# Altium PCB ePBR25_ACU_Power_rev0.PcbDoc (part 4 of 5)
Units mil, origin at the board's own origin, x right, y up, seen from the top; angles counter-clockwise.
Board outline 8211 x 3959 mil, 2 copper layers (Top Layer, Bottom Layer); 145 components, 129 nets, 544 pads, 1610 vias.
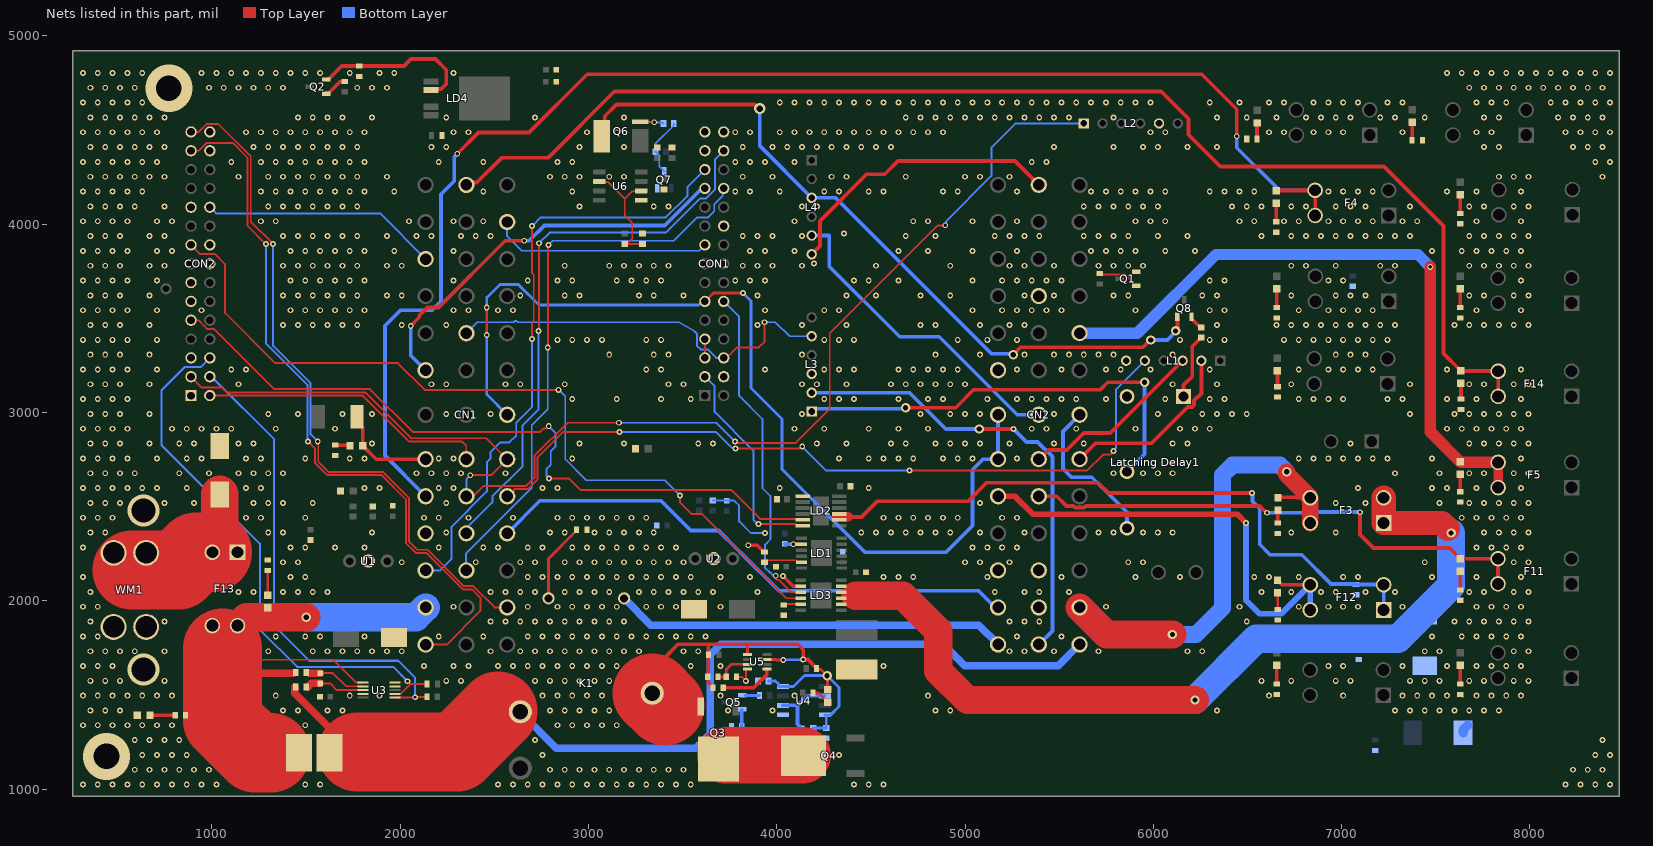
[diagram p3: the nets of this part, all layers, seen from the top]

## Via types
v1: diameter 31, hole 17, Top Layer to Bottom Layer, 1578 vias
v2: diameter 50, hole 28, Top Layer to Bottom Layer, 24 vias
v3: diameter 30, hole 15, Top Layer to Bottom Layer, 3 vias
v4: diameter 170, hole 128, Top Layer to Bottom Layer, 2 vias
v5: diameter 250, hole 137, Top Layer to Bottom Layer, 2 vias
v6: diameter 60, hole 34, Top Layer to Bottom Layer, 1 vias

## Nets (pads, with @x,y where several pads share a name; then routed paths per layer and width w, separated by ;. In a path a pad name is that pad's centre, name@x,y a point inside that pad or via, vN(x,y) a via of type N, cw(c..) or ccw(c..) an arc to the next point about the centre after c; other vN are vias at no path point) (continued)
GND: "Latching Delay1.2" C1.2 C2.1 C3.1 C4.1 C5.1 C6.1 C7.1 C8.1 C9.1 C10.2 C11.1 C12.1 C13.2 C14.1 C15.1 C16.2 C18.1 C20.2 C21.1 CN1.30 CN2.11 CN2.18 CN2.32 CN2.33 CN2.35 CON1.A3 CON1.A4 CON1.A14 CON1.A15 CON1.B2 CON1.B10 CON1.B15 CON2.A1 CON2.A3 CON2.A6 CON2.A7 CON2.A11 CON2.B8 CON2.B9 CON2.B14 CON2.B15 D17.1 D18.1 D19.2 D20.2 D22.1 L1.6 L2.5 L3.3 LD1.2 LD2.1 LD3.2 Q1.2 Q7.2 R2.2 R3.2 R4.2 R5.2 R6.2 R7.2 R8.2 R9.2 R10.2 R11.2 R12.2 R13.2 R14.2 R15.2 R16.2 R18.2 R19.2 R20.2 R21.1 R22.1 R24.2 R25.2 R26.1 R27.1 R29.1 R31.1 R37.2 R39.1 R40.1 R45.1 R46.2 R51.1 R52.1 R53.1 U1.2 U2.2 U3.4 U3.9 U3.10 U4.1 U5.4 U6.1 WM1.2 | length 1125.5
  Top Layer w10: CON1.A3@3618.02,3290 CON1.A4@3618.02,3390 ; R45.1@3786.56,1596 3813.7,1596 v1(3835.54,1574.15) 3835.54,1634.3 3838.42,1637.18 U5.4@3844.03,1637.18 ; R13.2@6652.22,1907.22 R13.2@6661,1898.44 ; R5.2@6656.06,2357.44 R5.2@6660,2357.44 ; R10.2@7630,1502.44 7633.94,1502.44 7642.72,1493.66 7642.72,1488.43 7643.34,1487.8 7643.34,1487.66
  Top Layer w18: v1(3848.7,2295.02) 3895.6,2295.02 3931.62,2259 R21.1@3932,2259 ; v1(4032.5,2132.36) 4088.38,2076.49 LD3.2@4127.5,2076.49 ; v1(4087,2299.99) LD1.2@4130.5,2299.98
  Top Layer w20: CON2.B14@989,4390 CON2.B14@1007.49,4390
  Top Layer w40: v5(440,1174) v5@458,1156
  Bottom Layer w10: R31.1@3660,2533.56 3661.56,2532 C15.1@3734,2532 3774,2532 3800,2506 3800,2422.04 3862.04,2360 v1@3937,2360 ; CN2.18@5142.11,3244.52 5147.59,3250 5165.21,3250 5165.21,3235 5175.27,3224.94 CN2.18@5175.98,3224.22 ; D17.1@7641.86,1293 D17.1@7641.86,1299
  Bottom Layer w18: C7.1@4043,2302 4045,2300 v1(4087,2299.99)
  Bottom Layer w50: D17.1@7644.86,1299 7644.86,1314 D17.1@7669.86,1339
  other v1: 314.96,1023.62 393.7,1023.62 472.44,1023.62 551.18,1023.62 629.92,1023.62 708.66,1023.62 787.4,1023.62 866.14,1023.62 944.88,1023.62 1023.62,1023.62 1496.06,1023.62 1574.8,1023.62 2519.69,1023.62 2598.43,1023.62 2677.17,1023.62 2755.91,1023.62 2834.65,1023.62 2913.39,1023.62 2992.13,1023.62 3070.87,1023.62 3149.61,1023.62 3228.35,1023.62 3307.09,1023.62 3385.83,1023.62 3464.57,1023.62 3543.31,1023.62 4409.45,1023.62 4488.19,1023.62 4566.93,1023.62 8188.98,1023.62 8267.72,1023.62 8346.46,1023.62 8425.2,1023.62 590.55,1102.36 669.29,1102.36 748.03,1102.36 826.77,1102.36 905.51,1102.36 984.25,1102.36 2795.28,1102.36 2874.02,1102.36 2952.76,1102.36 3031.5,1102.36 3110.24,1102.36 3188.98,1102.36 3267.72,1102.36 3346.46,1102.36 3425.2,1102.36 3503.94,1102.36 8228.35,1102.36 8307.09,1102.36 8385.83,1102.36 629.92,1181.1 708.66,1181.1 787.4,1181.1 866.14,1181.1 2755.91,1181.1 4330.71,1181.1 8346.46,1181.1 8425.2,1181.1 590.55,1259.84 669.29,1259.84 748.03,1259.84 826.77,1259.84 2716.54,1259.84 8385.83,1259.84 314.96,1338.58 393.7,1338.58 472.44,1338.58 551.18,1338.58 629.92,1338.58 708.66,1338.58 787.4,1338.58 1496.06,1338.58 2834.65,1338.58 2913.39,1338.58 2992.13,1338.58 3070.87,1338.58 3149.61,1338.58 354.33,1417.32 433.07,1417.32 511.81,1417.32 1377.95,1417.32 1456.69,1417.32 1614.17,1417.32 1692.91,1417.32 2795.28,1417.32 2874.02,1417.32 2952.76,1417.32 3031.5,1417.32 3110.24,1417.32 3740.16,1417.32 3976.38,1417.32 4842.52,1417.32 4921.26,1417.32 6338.59,1417.32 7283.47,1417.32 7362.21,1417.32 7440.95,1417.32 7519.69,1417.32 7598.43,1417.32 7677.17,1417.32 7755.91,1417.32 7834.65,1417.32 314.96,1496.06 393.7,1496.06 472.44,1496.06 551.18,1496.06 629.92,1496.06 708.66,1496.06 787.4,1496.06 1338.58,1496.06 1732.28,1496.06 1889.76,1496.06 2755.91,1496.06 2834.65,1496.06 2913.39,1496.06 2992.13,1496.06 3070.87,1496.06 3700.79,1496.06 4094.49,1496.06 4803.15,1496.06 6614.18,1496.06 7007.88,1496.06 7322.84,1496.06 7401.58,1496.06 7480.32,1496.06 7559.06,1496.06 7716.54,1496.06 7795.28,1496.06 7874.02,1496.06 7952.76,1496.06 354.33,1574.8 433.07,1574.8 511.81,1574.8 748.03,1574.8 2244.1,1574.8 2322.84,1574.8 2716.54,1574.8 2795.28,1574.8 2874.02,1574.8 2952.76,1574.8 3031.5,1574.8 3110.24,1574.8 6574.81,1574.8 6732.29,1574.8 6968.51,1574.8 7047.25,1574.8 7362.21,1574.8 7440.95,1574.8 7519.69,1574.8 7677.17,1574.8 7755.91,1574.8 7913.39,1574.8 7992.13,1574.8 314.96,1653.54 393.7,1653.54 472.44,1653.54 2125.99,1653.54 2283.47,1653.54 2362.21,1653.54 2519.69,1653.54 2598.43,1653.54 2677.17,1653.54 2755.91,1653.54 2834.65,1653.54 2913.39,1653.54 2992.13,1653.54 3070.87,1653.54 3149.61,1653.54 3543.31,1653.54 3700.79,1653.54 4566.93,1653.54 6929.14,1653.54 7007.88,1653.54 7322.84,1653.54 7559.06,1653.54 7716.54,1653.54 7795.28,1653.54 7874.02,1653.54 7952.76,1653.54 354.33,1732.28 433.07,1732.28 511.81,1732.28 590.55,1732.28 748.03,1732.28 1299.21,1732.28 1535.43,1732.28 1614.17,1732.28 1692.91,1732.28 1771.65,1732.28 1850.39,1732.28 1929.13,1732.28 2007.88,1732.28 2480.32,1732.28 2637.8,1732.28 2716.54,1732.28 2795.28,1732.28 2874.02,1732.28 2952.76,1732.28 3031.5,1732.28 3110.24,1732.28 3188.98,1732.28 3267.72,1732.28 3503.94,1732.28 3582.68,1732.28 5236.22,1732.28 5314.96,1732.28 5472.44,1732.28 5708.66,1732.28 6181.11,1732.28 6259.85,1732.28 7440.95,1732.28 7519.69,1732.28 7913.39,1732.28 7992.13,1732.28 314.96,1811.02 393.7,1811.02 1338.58,1811.02 1496.06,1811.02 1574.8,1811.02 1811.02,1811.02 2204.73,1811.02 2440.95,1811.02 2677.17,1811.02 2755.91,1811.02 2834.65,1811.02 2913.39,1811.02 2992.13,1811.02 3070.87,1811.02 3149.61,1811.02 3228.35,1811.02 3307.09,1811.02 3385.83,1811.02 3464.57,1811.02 3543.31,1811.02 3622.05,1811.02 5275.59,1811.02 5511.81,1811.02 7480.32,1811.02 7637.8,1811.02 7716.54,1811.02 7795.28,1811.02 7874.02,1811.02 7952.76,1811.02 354.33,1889.76 748.03,1889.76 2480.32,1889.76 2559.06,1889.76 2637.8,1889.76 2716.54,1889.76 2795.28,1889.76 2874.02,1889.76 2952.76,1889.76 3031.5,1889.76 3110.24,1889.76 3188.98,1889.76 5236.22,1889.76 5314.96,1889.76 5393.7,1889.76 6496.07,1889.76 7598.43,1889.76 7677.17,1889.76 7755.91,1889.76 7834.65,1889.76 7913.39,1889.76 7992.13,1889.76 314.96,1968.51 393.7,1968.51 2283.47,1968.51 2677.17,1968.51 2834.65,1968.51 2913.39,1968.51 2992.13,1968.51 3070.87,1968.51 3149.61,1968.51 3307.09,1968.51 3385.83,1968.51 3464.57,1968.51 3700.79,1968.51 5748.03,1968.51 6456.7,1968.51 6771.66,1968.51 6929.14,1968.51 7007.88,1968.51 7086.62,1968.51 7322.84,1968.51 7716.54,1968.51 7795.28,1968.51 7874.02,1968.51 7952.76,1968.51 354.33,2047.25 1141.73,2047.25 1220.47,2047.25 1377.95,2047.25 1456.69,2047.25 1535.43,2047.25 1614.17,2047.25 2480.32,2047.25 2559.06,2047.25 2637.8,2047.25 2716.54,2047.25 2874.02,2047.25 2952.76,2047.25 3031.5,2047.25 3110.24,2047.25 3267.72,2047.25 3346.46,2047.25 3425.2,2047.25 3503.94,2047.25 3582.68,2047.25 3661.42,2047.25 3897.64,2047.25 5157.48,2047.25 5314.96,2047.25 5393.7,2047.25 5551.18,2047.25 6574.81,2047.25 6732.29,2047.25 6889.77,2047.25 6968.51,2047.25 7125.99,2047.25 7283.47,2047.25 7677.17,2047.25 7755.91,2047.25 7913.39,2047.25 7992.13,2047.25 314.96,2125.99 1417.32,2125.99 1496.06,2125.99 2677.17,2125.99 2755.91,2125.99 2834.65,2125.99 2913.39,2125.99 2992.13,2125.99 3070.87,2125.99 3149.61,2125.99 3228.35,2125.99 3307.09,2125.99 3385.83,2125.99 3464.57,2125.99 3543.31,2125.99 3700.79,2125.99 3858.27,2125.99 4566.93,2125.99 4645.67,2125.99 4724.41,2125.99 5118.11,2125.99 5511.81,2125.99 5905.52,2125.99 6141.74,2125.99 6535.44,2125.99 6614.18,2125.99 6771.66,2125.99 7007.88,2125.99 7086.62,2125.99 7480.32,2125.99 7716.54,2125.99 7952.76,2125.99 1377.95,2204.73 1456.69,2204.73 2007.88,2204.73 2401.58,2204.73 2637.8,2204.73 2716.54,2204.73 2874.02,2204.73 2952.76,2204.73 3031.5,2204.73 3110.24,2204.73 3188.98,2204.73 3267.72,2204.73 3346.46,2204.73 3425.2,2204.73 3503.94,2204.73 5000,2204.73 5078.74,2204.73 5236.22,2204.73 5866.14,2204.73 5944.89,2204.73 7440.95,2204.73 7913.39,2204.73 7992.13,2204.73 314.96,2283.47 1417.32,2283.47 1496.06,2283.47 1653.54,2283.47 1811.02,2283.47 2204.73,2283.47 2440.95,2283.47 2519.69,2283.47 2677.17,2283.47 2755.91,2283.47 2913.39,2283.47 2992.13,2283.47 3070.87,2283.47 3149.61,2283.47 3228.35,2283.47 3307.09,2283.47 3385.83,2283.47 3464.57,2283.47 5039.37,2283.47 5118.11,2283.47 5196.85,2283.47 5275.59,2283.47 7716.54,2283.47 7795.28,2283.47 7874.02,2283.47 7952.76,2283.47 3937,2360.63 354.33,2362.21 433.07,2362.21 1299.21,2362.21 1377.95,2362.21 1850.39,2362.21 2244.1,2362.21 2795.28,2362.21 2874.02,2362.21 3031.5,2362.21 3110.24,2362.21 3188.98,2362.21 3267.72,2362.21 3346.46,2362.21 4448.82,2362.21 4527.56,2362.21 4606.3,2362.21 4685.04,2362.21 4763.78,2362.21 4842.52,2362.21 4921.26,2362.21 5078.74,2362.21 5314.96,2362.21 5708.66,2362.21 5787.4,2362.21 5944.89,2362.21 6023.63,2362.21 6102.37,2362.21 6732.29,2362.21 6968.51,2362.21 7755.91,2362.21 7834.65,2362.21 7913.39,2362.21 7992.13,2362.21 314.96,2440.95 393.7,2440.95 472.44,2440.95 1181.1,2440.95 1259.84,2440.95 1496.06,2440.95 2125.99,2440.95 2204.73,2440.95 2362.21,2440.95 2598.43,2440.95 2834.65,2440.95 2913.39,2440.95 2992.13,2440.95 3070.87,2440.95 3149.61,2440.95 3228.35,2440.95 3307.09,2440.95 4566.93,2440.95 4645.67,2440.95 4724.41,2440.95 4803.15,2440.95 4881.89,2440.95 4960.63,2440.95 5196.85,2440.95 5275.59,2440.95 7637.8,2440.95 7716.54,2440.95 7795.28,2440.95 7874.02,2440.95 7952.76,2440.95 354.33,2519.69 433.07,2519.69 511.81,2519.69 748.03,2519.69 905.51,2519.69 1220.47,2519.69 1299.21,2519.69 1377.95,2519.69 1535.43,2519.69 2244.1,2519.69 5078.74,2519.69 6968.51,2519.69 7125.99,2519.69 7519.69,2519.69 7677.17,2519.69 7755.91,2519.69 7834.65,2519.69 7913.39,2519.69 7992.13,2519.69 314.96,2598.43 393.7,2598.43 472.44,2598.43 551.18,2598.43 629.92,2598.43 708.66,2598.43 866.14,2598.43 1181.1,2598.43 1259.84,2598.43 1811.02,2598.43 1889.76,2598.43 2204.73,2598.43 2283.47,2598.43 2755.91,2598.43 2834.65,2598.43 4015.75,2598.43 4488.19,2598.43 7086.62,2598.43 7480.32,2598.43 7559.06,2598.43 7716.54,2598.43 7952.76,2598.43 354.33,2677.17 433.07,2677.17 511.81,2677.17 590.55,2677.17 826.77,2677.17 984.25,2677.17 1141.73,2677.17 1220.47,2677.17 1299.21,2677.17 1377.95,2677.17 2086.62,2677.17 2165.36,2677.17 2244.1,2677.17 2322.84,2677.17 2559.06,2677.17 5787.4,2677.17 5944.89,2677.17 6023.63,2677.17 6102.37,2677.17 7283.47,2677.17 7519.69,2677.17 7677.17,2677.17 7755.91,2677.17 7913.39,2677.17 7992.13,2677.17 314.96,2755.91 393.7,2755.91 472.44,2755.91 551.18,2755.91 708.66,2755.91 866.14,2755.91 944.88,2755.91 1181.1,2755.91 1259.84,2755.91 1496.06,2755.91 1732.28,2755.91 1811.02,2755.91 2204.73,2755.91 2283.47,2755.91 2913.39,2755.91 4330.71,2755.91 4488.19,2755.91 4566.93,2755.91 4645.67,2755.91 4724.41,2755.91 4881.89,2755.91 4960.63,2755.91 5039.37,2755.91 5275.59,2755.91 6771.66,2755.91 6850.4,2755.91 6929.14,2755.91 7007.88,2755.91 7086.62,2755.91 7165.36,2755.91 7244.1,2755.91 7480.32,2755.91 7952.76,2755.91 354.33,2834.65 433.07,2834.65 511.81,2834.65 669.29,2834.65 826.77,2834.65 905.51,2834.65 1141.73,2834.65 1220.47,2834.65 1850.39,2834.65 2952.76,2834.65 3188.98,2834.65 3582.68,2834.65 3661.42,2834.65 4212.6,2834.65 4370.08,2834.65 4606.3,2834.65 4685.04,2834.65 4842.52,2834.65 4921.26,2834.65 5000,2834.65 5078.74,2834.65 5236.22,2834.65 5472.44,2834.65 5629.92,2834.65 6102.37,2834.65 6181.11,2834.65 7047.25,2834.65 7677.17,2834.65 7755.91,2834.65 7834.65,2834.65 7913.39,2834.65 7992.13,2834.65 314.96,2913.39 393.7,2913.39 472.44,2913.39 551.18,2913.39 787.4,2913.39 866.14,2913.39 944.88,2913.39 1023.62,2913.39 1102.36,2913.39 1338.58,2913.39 1653.54,2913.39 4094.49,2913.39 4251.97,2913.39 4488.19,2913.39 4645.67,2913.39 4803.15,2913.39 5354.33,2913.39 5433.07,2913.39 5590.55,2913.39 5905.52,2913.39 6141.74,2913.39 6220.48,2913.39 6299.22,2913.39 7559.06,2913.39 7637.8,2913.39 7716.54,2913.39 7795.28,2913.39 7874.02,2913.39 7952.76,2913.39 354.33,2992.13 433.07,2992.13 511.81,2992.13 669.29,2992.13 1299.21,2992.13 1456.69,2992.13 1692.91,2992.13 1850.39,2992.13 2244.1,2992.13 2480.32,2992.13 4133.86,2992.13 4763.78,2992.13 4921.26,2992.13 5000,2992.13 5078.74,2992.13 5472.44,2992.13 6023.63,2992.13 6259.85,2992.13 6338.59,2992.13 6417.33,2992.13 6496.07,2992.13 7362.21,2992.13 7598.43,2992.13 7677.17,2992.13 7755.91,2992.13 7834.65,2992.13 7913.39,2992.13 7992.13,2992.13 314.96,3070.87 393.7,3070.87 472.44,3070.87 551.18,3070.87 2913.39,3070.87 3149.61,3070.87 3385.83,3070.87 3543.31,3070.87 4251.97,3070.87 4330.71,3070.87 4409.45,3070.87 4645.67,3070.87 4803.15,3070.87 4881.89,3070.87 5118.11,3070.87 5275.59,3070.87 5354.33,3070.87 5433.07,3070.87 5511.81,3070.87 5590.55,3070.87 5748.03,3070.87 6063,3070.87 6299.22,3070.87 6377.96,3070.87 6771.66,3070.87 6850.4,3070.87 6929.14,3070.87 7007.88,3070.87 7244.1,3070.87 7322.84,3070.87 7559.06,3070.87 7716.54,3070.87 7952.76,3070.87 354.33,3149.61 433.07,3149.61 511.81,3149.61 669.29,3149.61 1141.73,3149.61 2165.36,3149.61 2244.1,3149.61 2559.06,3149.61 2637.8,3149.61 2874.02,3149.61 3425.2,3149.61 3503.94,3149.61 4133.86,3149.61 4212.6,3149.61 4370.08,3149.61 4606.3,3149.61 4685.04,3149.61 4763.78,3149.61 4842.52,3149.61 4921.26,3149.61 5000,3149.61 6102.37,3149.61 6338.59,3149.61 6732.29,3149.61 7362.21,3149.61 7677.17,3149.61 7755.91,3149.61 7913.39,3149.61 7992.13,3149.61 314.96,3228.35 393.7,3228.35 472.44,3228.35 551.18,3228.35 708.66,3228.35 1102.36,3228.35 1181.1,3228.35 3307.09,3228.35 3385.83,3228.35 3937.01,3228.35 4251.97,3228.35 4330.71,3228.35 4409.45,3228.35 4645.67,3228.35 4724.41,3228.35 4803.15,3228.35 4881.89,3228.35 4960.63,3228.35 5275.59,3228.35 5511.81,3228.35 5748.03,3228.35 5826.77,3228.35 5984.26,3228.35 6299.22,3228.35 6771.66,3228.35 6929.14,3228.35 7007.88,3228.35 7086.62,3228.35 7165.36,3228.35 7559.06,3228.35 7952.76,3228.35 354.33,3307.09 433.07,3307.09 511.81,3307.09 669.29,3307.09 3110.24,3307.09 3346.46,3307.09 3425.2,3307.09 4133.86,3307.09 4842.52,3307.09 5078.74,3307.09 5314.96,3307.09 5472.44,3307.09 5551.18,3307.09 5629.92,3307.09 5708.66,3307.09 5787.4,3307.09 6102.37,3307.09 6968.51,3307.09 7047.25,3307.09 7125.99,3307.09 314.96,3385.83 393.7,3385.83 472.44,3385.83 551.18,3385.83 708.66,3385.83 2834.65,3385.83 2913.39,3385.83 2992.13,3385.83 3070.87,3385.83 3307.09,3385.83 3385.83,3385.83 4251.97,3385.83 4330.71,3385.83 4409.45,3385.83 4960.63,3385.83 5118.11,3385.83 5275.59,3385.83 6141.74,3385.83 6299.22,3385.83 6377.96,3385.83 6692.92,3385.83 6771.66,3385.83 6850.4,3385.83 6929.14,3385.83 7007.88,3385.83 7086.62,3385.83 7165.36,3385.83 7244.1,3385.83 354.33,3464.57 433.07,3464.57 511.81,3464.57 669.29,3464.57 1377.95,3464.57 1456.69,3464.57 1535.43,3464.57 1614.17,3464.57 1692.91,3464.57 1771.65,3464.57 2007.88,3464.57 2244.1,3464.57 3897.64,3464.57 4133.86,3464.57 4370.08,3464.57 4763.78,3464.57 4842.52,3464.57 5078.74,3464.57 5236.22,3464.57 5314.96,3464.57 6338.59,3464.57 6653.55,3464.57 6732.29,3464.57 6811.03,3464.57 6889.77,3464.57 6968.51,3464.57 7047.25,3464.57 7125.99,3464.57 7204.73,3464.57 7283.47,3464.57 7598.43,3464.57 7677.17,3464.57 7755.91,3464.57 7834.65,3464.57 7913.39,3464.57 7992.13,3464.57 314.96,3543.31 393.7,3543.31 472.44,3543.31 551.18,3543.31 708.66,3543.31 944.88,3543.31 1417.32,3543.31 1496.06,3543.31 1574.8,3543.31 1653.54,3543.31 1732.28,3543.31 1811.02,3543.31 2283.47,3543.31 2362.21,3543.31 2519.69,3543.31 2598.43,3543.31 3937.01,3543.31 4251.97,3543.31 4330.71,3543.31 5039.37,3543.31 5196.85,3543.31 5275.59,3543.31 5354.33,3543.31 5433.07,3543.31 5511.81,3543.31 5905.52,3543.31 6299.22,3543.31 6377.96,3543.31 6771.66,3543.31 6929.14,3543.31 7007.88,3543.31 7086.62,3543.31 7165.36,3543.31 7716.54,3543.31 7952.76,3543.31 354.33,3622.05 433.07,3622.05 511.81,3622.05 669.29,3622.05 1377.95,3622.05 1456.69,3622.05 1535.43,3622.05 1614.17,3622.05 1692.91,3622.05 1771.65,3622.05 1929.13,3622.05 2007.88,3622.05 2637.8,3622.05 2874.02,3622.05 2952.76,3622.05 3267.72,3622.05 3346.46,3622.05 3503.94,3622.05 3897.64,3622.05 4370.08,3622.05 4527.56,3622.05 4763.78,3622.05 4921.26,3622.05 5314.96,3622.05 5472.44,3622.05 5787.4,3622.05 5866.14,3622.05 6259.85,3622.05 6338.59,3622.05 6732.29,3622.05 6968.51,3622.05 7047.25,3622.05 7125.99,3622.05 7677.17,3622.05 7755.91,3622.05 7913.39,3622.05 7992.13,3622.05 314.96,3700.79 393.7,3700.79 472.44,3700.79 551.18,3700.79 708.66,3700.79 1417.32,3700.79 1496.06,3700.79 1574.8,3700.79 1653.54,3700.79 1732.28,3700.79 1811.02,3700.79 2283.47,3700.79 2677.17,3700.79 2834.65,3700.79 2913.39,3700.79 3149.61,3700.79 3228.35,3700.79 3307.09,3700.79 3385.83,3700.79 3779.53,3700.79 3858.27,3700.79 3937.01,3700.79 4409.45,3700.79 4488.19,3700.79 4645.67,3700.79 5039.37,3700.79 5196.85,3700.79 5275.59,3700.79 5354.33,3700.79 5433.07,3700.79 5511.81,3700.79 6299.22,3700.79 6377.96,3700.79 6929.14,3700.79 7007.88,3700.79 7952.76,3700.79 354.33,3779.53 433.07,3779.53 511.81,3779.53 669.29,3779.53 748.03,3779.53 1377.95,3779.53 1456.69,3779.53 1535.43,3779.53 1614.17,3779.53 1692.91,3779.53 1771.65,3779.53 1929.13,3779.53 2007.88,3779.53 2874.02,3779.53 3110.24,3779.53 3188.98,3779.53 3267.72,3779.53 3346.46,3779.53 3425.2,3779.53 3818.9,3779.53 3897.64,3779.53 3976.38,3779.53 4133.86,3779.53 4527.56,3779.53 4921.26,3779.53 5236.22,3779.53 5314.96,3779.53 5472.44,3779.53 5708.66,3779.53 5787.4,3779.53 5866.14,3779.53 5944.89,3779.53 6732.29,3779.53 6811.03,3779.53 6968.51,3779.53 7204.73,3779.53 7283.47,3779.53 7677.17,3779.53 7755.91,3779.53 7834.65,3779.53 7913.39,3779.53 7992.13,3779.53 4198.23,3791.76 314.96,3858.27 393.7,3858.27 472.44,3858.27 551.18,3858.27 708.66,3858.27 787.4,3858.27 1417.32,3858.27 1496.06,3858.27 1574.8,3858.27 1653.54,3858.27 1732.28,3858.27 1811.02,3858.27 1968.51,3858.27 2283.47,3858.27 3858.27,3858.27 3937.01,3858.27 4094.49,3858.27 4645.67,3858.27 4803.15,3858.27 5039.37,3858.27 5275.59,3858.27 5669.29,3858.27 5748.03,3858.27 5826.77,3858.27 5905.52,3858.27 6063,3858.27 6220.48,3858.27 7480.32,3858.27 7637.8,3858.27 7716.54,3858.27 7795.28,3858.27 7874.02,3858.27 7952.76,3858.27 354.33,3937.01 433.07,3937.01 511.81,3937.01 669.29,3937.01 748.03,3937.01 1377.95,3937.01 1456.69,3937.01 1535.43,3937.01 1614.17,3937.01 1692.91,3937.01 1771.65,3937.01 1929.13,3937.01 2086.62,3937.01 2165.36,3937.01 2322.84,3937.01 2401.58,3937.01 2480.32,3937.01 3818.9,3937.01 3897.64,3937.01 3976.38,3937.01 4133.86,3937.01 4685.04,3937.01 4842.52,3937.01 5157.48,3937.01 5236.22,3937.01 5314.96,3937.01 5393.7,3937.01 5629.92,3937.01 5708.66,3937.01 5787.4,3937.01 5866.14,3937.01 6023.63,3937.01 6181.11,3937.01 6574.81,3937.01 6732.29,3937.01 6811.03,3937.01 6889.77,3937.01 6968.51,3937.01 7047.25,3937.01 7125.99,3937.01 7204.73,3937.01 7283.47,3937.01 7362.21,3937.01 7677.17,3937.01 7755.91,3937.01 7834.65,3937.01 7913.39,3937.01 7992.13,3937.01 4356.78,3950.31 314.96,4015.75 393.7,4015.75 472.44,4015.75 551.18,4015.75 708.66,4015.75 787.4,4015.75 1259.84,4015.75 1338.58,4015.75 2047.25,4015.75 2283.47,4015.75 2440.95,4015.75 4094.49,4015.75 4724.41,4015.75 4803.15,4015.75 5039.37,4015.75 5275.59,4015.75 5905.52,4015.75 5984.26,4015.75 6063,4015.75 6456.7,4015.75 6535.44,4015.75 6692.92,4015.75 6771.66,4015.75 6929.14,4015.75 7007.88,4015.75 7086.62,4015.75 7165.36,4015.75 7322.84,4015.75 7401.58,4015.75 7716.54,4015.75 7952.76,4015.75 354.33,4094.49 433.07,4094.49 511.81,4094.49 590.55,4094.49 748.03,4094.49 1299.21,4094.49 1377.95,4094.49 1456.69,4094.49 1535.43,4094.49 1614.17,4094.49 1692.91,4094.49 1771.65,4094.49 2952.76,4094.49 3346.46,4094.49 3425.2,4094.49 4133.86,4094.49 4212.6,4094.49 5629.92,4094.49 5708.66,4094.49 5787.4,4094.49 5866.14,4094.49 5944.89,4094.49 6023.63,4094.49 6417.33,4094.49 6496.07,4094.49 6574.81,4094.49 6732.29,4094.49 6811.03,4094.49 6968.51,4094.49 7047.25,4094.49 7125.99,4094.49 7362.21,4094.49 7677.17,4094.49 7755.91,4094.49 7913.39,4094.49 7992.13,4094.49 314.96,4173.23 393.7,4173.23 472.44,4173.23 551.18,4173.23 629.92,4173.23 1259.84,4173.23 1338.58,4173.23 1417.32,4173.23 1496.06,4173.23 1574.8,4173.23 1653.54,4173.23 1732.28,4173.23 1811.02,4173.23 1968.51,4173.23 2440.95,4173.23 2913.39,4173.23 3779.53,4173.23 3858.27,4173.23 4015.75,4173.23 4251.97,4173.23 4330.71,4173.23 4488.19,4173.23 4566.93,4173.23 4881.89,4173.23 4960.63,4173.23 5275.59,4173.23 5669.29,4173.23 5748.03,4173.23 5826.77,4173.23 5905.52,4173.23 5984.26,4173.23 6063,4173.23 6299.22,4173.23 6377.96,4173.23 6456.7,4173.23 6535.44,4173.23 6929.14,4173.23 7007.88,4173.23 7086.62,4173.23 7165.36,4173.23 7559.06,4173.23 7716.54,4173.23 7952.76,4173.23 354.33,4251.97 433.07,4251.97 511.81,4251.97 590.55,4251.97 669.29,4251.97 748.03,4251.97 1141.73,4251.97 1299.21,4251.97 1377.95,4251.97 1456.69,4251.97 1535.43,4251.97 1614.17,4251.97 1692.91,4251.97 1771.65,4251.97 1929.13,4251.97 2795.28,4251.97 2874.02,4251.97 2952.76,4251.97 3110.24,4251.97 3188.98,4251.97 3818.9,4251.97 3976.38,4251.97 4291.34,4251.97 4370.08,4251.97 4685.04,4251.97 5000,4251.97 5078.74,4251.97 5236.22,4251.97 7834.65,4251.97 7913.39,4251.97 7992.13,4251.97 8385.83,4251.97 314.96,4330.71 393.7,4330.71 472.44,4330.71 551.18,4330.71 629.92,4330.71 708.66,4330.71 1102.36,4330.71 1259.84,4330.71 1338.58,4330.71 1417.32,4330.71 1496.06,4330.71 1574.8,4330.71 1653.54,4330.71 1732.28,4330.71 1811.02,4330.71 2204.73,4330.71 2440.95,4330.71 2834.65,4330.71 2913.39,4330.71 3779.53,4330.71 3858.27,4330.71 3937.01,4330.71 4094.49,4330.71 5354.33,4330.71 5433.07,4330.71 8346.46,4330.71 8425.2,4330.71 354.33,4409.45 433.07,4409.45 511.81,4409.45 590.55,4409.45 669.29,4409.45 748.03,4409.45 1220.47,4409.45 1299.21,4409.45 1377.95,4409.45 1456.69,4409.45 1535.43,4409.45 1614.17,4409.45 1692.91,4409.45 1771.65,4409.45 2165.36,4409.45 2244.1,4409.45 2952.76,4409.45 3188.98,4409.45 3818.9,4409.45 3976.38,4409.45 4055.12,4409.45 4133.86,4409.45 4212.6,4409.45 4291.34,4409.45 4370.08,4409.45 4448.82,4409.45 4527.56,4409.45 4606.3,4409.45 5472.44,4409.45 5787.4,4409.45 5944.89,4409.45 6023.63,4409.45 6181.11,4409.45 6338.59,4409.45 7755.91,4409.45 7834.65,4409.45 8228.35,4409.45 8307.09,4409.45 8385.83,4409.45 314.96,4488.19 393.7,4488.19 472.44,4488.19 551.18,4488.19 629.92,4488.19 708.66,4488.19 1181.1,4488.19 1259.84,4488.19 1338.58,4488.19 1417.32,4488.19 1496.06,4488.19 1574.8,4488.19 1653.54,4488.19 1732.28,4488.19 1811.02,4488.19 2283.47,4488.19 2362.21,4488.19 2992.13,4488.19 3149.61,4488.19 3779.53,4488.19 3858.27,4488.19 4015.75,4488.19 4094.49,4488.19 4173.23,4488.19 4251.97,4488.19 4330.71,4488.19 4409.45,4488.19 4488.19,4488.19 4566.93,4488.19 4645.67,4488.19 4724.41,4488.19 4803.15,4488.19 4881.89,4488.19 5984.26,4488.19 6063,4488.19 6614.18,4488.19 6692.92,4488.19 6850.4,4488.19 6929.14,4488.19 7007.88,4488.19 7322.84,4488.19 7716.54,4488.19 7795.28,4488.19 8188.98,4488.19 8267.72,4488.19 8346.46,4488.19 8425.2,4488.19 354.33,4566.93 433.07,4566.93 511.81,4566.93 590.55,4566.93 669.29,4566.93 748.03,4566.93 1456.69,4566.93 1535.43,4566.93 1614.17,4566.93 1692.91,4566.93 1850.39,4566.93 2244.1,4566.93 2716.54,4566.93 3188.98,4566.93 4685.04,4566.93 4763.78,4566.93 4842.52,4566.93 4921.26,4566.93 5000,4566.93 5078.74,4566.93 5157.48,4566.93 5236.22,4566.93 5314.96,4566.93 5393.7,4566.93 5472.44,4566.93 5551.18,4566.93 5787.4,4566.93 6338.59,4566.93 6496.07,4566.93 6653.55,4566.93 6811.03,4566.93 6889.77,4566.93 6968.51,4566.93 7047.25,4566.93 7204.73,4566.93 7283.47,4566.93 7440.95,4566.93 7755.91,4566.93 7834.65,4566.93 8149.61,4566.93 8228.35,4566.93 8307.09,4566.93 8385.83,4566.93 314.96,4645.67 393.7,4645.67 472.44,4645.67 551.18,4645.67 629.92,4645.67 4015.75,4645.67 4094.49,4645.67 4173.23,4645.67 4251.97,4645.67 4330.71,4645.67 4409.45,4645.67 4488.19,4645.67 4566.93,4645.67 4645.67,4645.67 4724.41,4645.67 4803.15,4645.67 4881.89,4645.67 4960.63,4645.67 5039.37,4645.67 5118.11,4645.67 5196.85,4645.67 5275.59,4645.67 5354.33,4645.67 5433.07,4645.67 5511.81,4645.67 5590.55,4645.67 5669.29,4645.67 5748.03,4645.67 5826.77,4645.67 5905.52,4645.67 5984.26,4645.67 6299.22,4645.67 6456.7,4645.67 6614.18,4645.67 6692.92,4645.67 6850.4,4645.67 6929.14,4645.67 7007.88,4645.67 7086.62,4645.67 7244.1,4645.67 7322.84,4645.67 7716.54,4645.67 7795.28,4645.67 7874.02,4645.67 8110.24,4645.67 8188.98,4645.67 8267.72,4645.67 8346.46,4645.67 8425.2,4645.67 354.33,4724.41 433.07,4724.41 511.81,4724.41 590.55,4724.41 984.25,4724.41 1062.99,4724.41 1141.73,4724.41 1220.47,4724.41 1299.21,4724.41 1377.95,4724.41 1771.65,4724.41 1850.39,4724.41 1929.13,4724.41 7677.17,4724.41 7755.91,4724.41 7834.65,4724.41 7913.39,4724.41 7992.13,4724.41 8070.87,4724.41 8149.61,4724.41 8228.35,4724.41 8307.09,4724.41 8385.83,4724.41 314.96,4803.15 393.7,4803.15 472.44,4803.15 551.18,4803.15 629.92,4803.15 944.88,4803.15 1023.62,4803.15 1102.36,4803.15 1181.1,4803.15 1259.84,4803.15 1338.58,4803.15 1417.32,4803.15 1496.06,4803.15 1574.8,4803.15 1732.28,4803.15 1889.76,4803.15 1968.51,4803.15 2283.47,4803.15 7559.06,4803.15 7637.8,4803.15 7716.54,4803.15 7795.28,4803.15 7874.02,4803.15 7952.76,4803.15 8031.5,4803.15 8110.24,4803.15 8188.98,4803.15 8267.72,4803.15 8346.46,4803.15 8425.2,4803.15
  other v4: 637.22,1635.41 637.22,2480.29
  other v5: 771,4722
GREEN_LED_GND: CN2.23 L1.3 | length 979.2
  Top Layer w20: CN2.23@5392.52,2751.78 5441.74,2801 5539.98,2801 5629.98,2891 5771,2891 L1.3@6155,3275
HCP_H_CURR_SENS: CN1.23 CON2.B1 | length 1543.5
  Top Layer w10: CON2.B1@989,3090 1801.43,3090 2045.43,2846 2327.02,2846 2350.86,2822.15 2350.86,2752.45 CN1.23@2351.54,2751.78
HCP_L_CURR_SENS: CN1.22 CN1.26 CON2.A2 L2.1 | length 6797.4
  Top Layer w10: CON2.A2@889,3190 946.88,3132.12 1055.39,3132.12 1080.5,3107 1815,3107 2059,2863 2455.9,2863 2567.12,2751.78 CN1.22@2568.07,2751.78 2483.29,2667 v1(2372,2667) ; CN1.26@2351.54,2554.93 2388.28,2554.93 2443.59,2610.24 2590.98,2610.24 2591.22,2610 2670.06,2610 2713,2652.94 2713,2769.08 2889.33,2945.42 v1(3161.06,2945.42) ; v1@3777.55,2837 4097.37,2837 4281,3020.63 4281,3420 4855,3994 v1(4895,3994)
  Bottom Layer w10: CN1.26@2351.54,2554.93 2351.54,2644.33 2372,2664.8 v1(2372,2667) ; v1(3161.06,2945.42) 3678.65,2945.42 v1(3777.55,2846.52) ; v1(4895,3994) 4898.05,3997.05 4898.05,4014.09 5140,4256.04 5140,4406.96 5268.04,4535 L2.1@5630,4535
HCP_SENS_PWR: CN1.24 D15.1 F15.2 | length 530.8
  Top Layer w20: F15.2@1770.35,2977.95 1770.35,2950.98 1800.46,2920.87 D15.1@1800.46,2824.09 1872.77,2751.78 CN1.24@2135,2751.78
HVB_PWR: CN1.2 D14.1 F14.3 F14.4 | length 6879.9
  Top Layer w20: CN1.2@2351.54,4208.47 2364.28,4221.22 2406.22,4221.22 2537.29,4352.29 2785.41,4352.29 3137.12,4704 6042,4704 6186.3,4559.7 6186.3,4474.7 6355,4306 7224,4306 7540.04,3989.96 7540.04,3313.43 D14.1@7632,3221.46 7633.27,3220.2 7829.85,3220.2 F14.4@7831.12,3218.93 F14.3@7831.12,3085.07
IMD_LED: CN2.2 L4.6 | length 1543.8
  Top Layer w20: L4.6@4185,3840 4229.52,3884.52 4229.52,4017.73 4476.79,4265 4573.18,4265 4644.18,4336 5264.99,4336 CN2.2@5392.52,4208.47
IMD_OK: CN1.14 CON1.B3 L3.5 | length 2148.6
  Top Layer w10: CON1.B3@3718.02,3290 3723.02,3285 3736.02,3298 3739.02,3295 3789.26,3345.24 3905.24,3345.24 3935.15,3375.15 v1(3935.15,3479.5)
  Bottom Layer w10: CN1.14@2351.54,3421.07 2408.81,3478.35 2599.91,3479.5 2601.1,3479.88 2603.04,3480.73 2604.24,3481.45 2605.23,3482.27 2608.36,3485.4 2618.3,3485.4 2624.2,3479.5 3480.83,3479.5 3560.08,3433.88 3565.96,3428 3567,3428 3575.9,3419.1 3575.9,3354.1 3595,3335 3632.58,3335 3677.58,3290 CON1.B3@3718.02,3290 ; v1(3935.15,3479.5) 3993,3479.5 4067.5,3405 L3.5@4185,3405
IMD_PWR: CN1.27 D5.1 F4.3 F4.4 | length 7612.8
  Top Layer w20: v1(2303,4374) 2416,4487 2683.9,4487 2992.9,4796 6257,4796 6443,4610 v1(6443,4466.65) ; D5.1@6652,4178.46 6652.73,4179.2 6858.38,4179.2 F4.4@6859.12,4179.93 F4.3@6859.12,4046.07
  Bottom Layer w20: CN1.27@2135,2554.93 1919,2770.93 1919,3460.26 2001.74,3543 2169,3543 2217,3591 2217,4159.23 2287,4229.23 2287,4356.78 2303,4372.78 v1(2303,4374) ; v1(6443,4466.65) 6443,4406 6669.07,4179.93 F4.4@6859.12,4179.93
IMD_RESIST: CN1.9 CON2.B11 | length 1260
  Bottom Layer w10: CON2.B11@989,4090 1022,4057 1892.77,4057 CN1.9@2135,3814.77
LATCH_RST: CN2.38 L3.2 | length 2446.5
  Top Layer w20: v2(5074.51,2912.35) v1(5256.78,2912.35)
  Bottom Layer w20: L3.2@4185,3105 4704.82,3105 4897.48,2912.35 v2(5074.51,2912.35) ; v1(5256.78,2912.35) 5325.43,2843.69 5385.22,2843.69 5463.5,2765.41 5463.5,1839.94 CN2.38@5391.46,1767.91
LATCHING_Delayed: L4.3 Q6.5-8 Q8.1 | length 4002.2
  Top Layer w20: Q6.5-8@3045.64,4443 3086.05,4483.41 3086.05,4572.9 3149.15,4636 3882,4636 v6@3907,4611 ; v2(5256.08,3307.28) 5295.81,3347.01 5946.01,3347.01 v2@5980,3381 ; v2(6118,3433) 6118,3441.12 6127.52,3450.64 Q8.1@6127.52,3508.56
  Bottom Layer w20: v6@3907,4611 v6(3910,4614) 3910,4415 L4.3@4185,4140 4312,4140 5140,3312 v2@5260,3312 ; v2(5986.39,3384.88) 6074.19,3384.88 6118,3428.69 v2(6118,3433)
MC_PWR: CN2.27 D12.1 F12.3 F12.4 | length 2537.7
  Top Layer w20: D12.1@6659,2108.46 6682.61,2084.86 F12.4@6833.12,2084.86
  Top Layer w30: CN2.27@5175.98,2554.93 5264.01,2554.93 5359,2459.94 6445.62,2459.94 v1(6492,2413.56)
  Bottom Layer w30: v1(6492,2413.56) 6492,2003.16 6564.43,1930.73 6678.99,1930.73 F12.4@6833.12,2084.86 F12.3@6833.12,1951
MC_PWR_CTRL: CON1.A2 LD2.6 | length 1140.6
  Top Layer w10: v1(3902.92,2407.5) 4099.38,2407.5 4108.62,2398.26 LD2.6@4137.56,2398.26
  Bottom Layer w10: CON1.A2@3619,3190 3670,3139 3670,3003 3876.13,2796.87 3876.13,2430.91 3899.53,2407.5 v1(3902.92,2407.5)
MC_PWR_FB: CON2.A5 LD2.5 | length 3914.5
  Top Layer w10: CON2.A5@889,3490 929.44,3490 957.44,3462 976.44,3443 1011.96,3443 1330.96,3124 1839.46,3124 2066.46,2897 2743.78,2897 2760.78,2914 2769.95,2914 2783.31,2927.36 v1(2788.99,2927.36) ; v1(2790,2650) 2896.04,2650 2956.74,2589.3 3757.24,2589.3 3911.54,2435 4097.92,2435 4098.32,2434.6 4132.72,2434.6 LD2.5@4137.56,2429.76
  Bottom Layer w10: v1(2788.99,2927.36) 2825.5,2890.85 2825.5,2820.12 2799.5,2794.12 2799.5,2723.39 2777.5,2701.39 2777.5,2662.5 v1(2790,2650)
MC_PWR_FUSE: F12.1 F12.2 LD2.8 LD2.9 R20.1 | length 3474.6
  Top Layer w20: 4379.66,2445.5 4393.21,2445.5 4449.27,2445.5 4531.77,2528 5015.36,2528 5114.06,2626.7 5707.3,2626.7 5762,2572 v1(6524,2572)
  Top Layer w50: 4317.36,2445.5 4379.66,2445.5
  Bottom Layer w20: v1(6524,2572) 6526.1,2569.9 6526.1,2527.96 6564.43,2489.63 6564.43,2299.88 6619.75,2244.56 6787.74,2244.56 6943.74,2088.56 7068,2088.56 7069.85,2086.71 7221.03,2086.71 F12.2@7222.88,2084.86 F12.1@7222.88,1951
NetD1_2: D1.2 R2.1 | length 99
  Top Layer w20: R2.1@6655,3557.56 D1.2@6655,3656.53
NetD2_2: D2.2 R3.1 | length 85.7
  Top Layer w20: R3.1@6550.56,4452 D2.2@6550.56,4537.09
  Top Layer w40: D2.2@6550.56,4537.09 D2.2@6551,4537.53
NetD3_2: D3.2 R4.1 | length 99
  Top Layer w20: R4.1@7630,3557.56 D3.2@7630,3656.53
NetD4_2: D4.2 R5.1 | length 70.7
  Top Layer w20: R5.1@6660,2412.56 6661,2413.56 6661,2480.03 D4.2@6662,2481.03 ; D4.2@6661,2484.53 D4.2@6662,2485.53
NetD5_2: D5.2 R6.1 | length 99
  Top Layer w20: R6.1@6652,4012.56 D5.2@6652,4111.53
NetD6_2: D6.2 R7.1 | length 91.8
  Top Layer w20: R7.1@7630,2579.19 D6.2@7630,2671
NetD7_2: D7.2 R8.1 | length 99
  Top Layer w20: R8.1@6655,1557.56 D7.2@6655,1656.53
NetD8_2: D8.2 R9.1 | length 99
  Top Layer w20: R9.1@7630,4057.56 D8.2@7630,4156.53
NetD9_2: D9.2 R10.1 | length 99
  Top Layer w20: R10.1@7630,1557.56 D9.2@7630,1656.53
NetD10_2: D10.2 R11.1 | length 96.9
  Top Layer w20: R11.1@7373.44,4445 7374.17,4445.73 7374.17,4540.58 D10.2@7374.9,4541.31
NetD11_2: D11.2 R12.1 | length 99
  Top Layer w20: R12.1@7630,2057.56 D11.2@7630,2156.53
NetD12_2: D12.2 R13.1 | length 91.6
  Top Layer w15: R13.1@6657,1960.56 R13.1@6658,1961.56 ; D12.2@6658,2040.53 D12.2@6659,2041.53 6660,2040.53 6660,1954.56 R13.1@6661,1953.56
NetD13_2: D13.2 R14.1 | length 132.3
  Top Layer w15: R14.1@1295.77,2161.23 1296.38,2160.61 1296.38,2030.08 D13.2@1297,2029.47
NetD14_2: D14.2 R15.1 | length 83.8
  Top Layer w20: D14.2@7632,3154.53 7633,3153.53 7633,3072.56 R15.1@7634,3071.56
NetD15_2: D15.2 R16.1 | length 80.2
  Top Layer w20: R16.1@1654.38,2826.52 1731.1,2826.52 D15.2@1733.53,2824.09
NetD16_2: D16.2 R18.1 | length 83.9
  Top Layer w20: R18.1@6659,3136.56 D16.2@6659,3220.46
NetD21_2: D21.2 R44.2 | length 98.7
  Top Layer w15: R44.2@4192.55,1510.89 4221.7,1510.89 D21.2@4270.9,1461.69
NetD22_2: D22.2 R48.2 | length 134
  Top Layer w20: D22.2@671.24,1391.5 R48.2@805.21,1391.5
NetK1_A2: K1.A2 R37.1 | length 425.9
  Top Layer w15: K1.A2@2787.45,2013.01 2787.45,2223.54 2936.97,2373.06 R37.1@2936.97,2377
"NetLatching Delay1_1": "Latching Delay1.1" R54.2 | length 352.2
  Top Layer w20: 6160,3085 6160,3145.88 6205.99,3191.87 6205.99,3349.73 6245.86,3389.6 6245.86,3391.57 6251.61,3397.31 R54.2@6253.57,3397.31
NetLD1_5: LD1.5 R21.2 | length 203.8
  Top Layer w10: R21.2@3935,2204.44 3943.78,2213.22 3951.81,2213.22 3953.57,2214.99 4101.26,2214.99 4110.75,2205.5 LD1.5@4130.5,2205.5
NetLD3_5: LD3.5 R26.2 | length 90.5
  Top Layer w10: R26.2@4037,1982 LD3.5@4127.5,1982
NetLD4_2: LD4.2 Q2.2 R24.1 | length 876.7
  Top Layer w20: Q2.2@1607.29,4768.4 1618.12,4768.4 1689.72,4840 2020.27,4840 2058.04,4877.76 2187.87,4877.76 2245,4820.64 2245,4744.76 2218.33,4718.09 2169.23,4718.09 LD4.2@2164.02,4712.88
NetQ1_1: Q1.1 R1.2 | length 227.7
  Top Layer w10: R1.2@5715,3737.56 5718.75,3733.81 5848.32,3733.81 5891.65,3690.47 5891.65,3679.41 5898.46,3672.6 Q1.1@5909.29,3672.6
NetQ2_1: Q2.1 R23.2 | length 125.6
  Top Layer w20: Q2.1@1607.29,4693.6 1618.12,4693.6 1679.3,4754.78 1702.22,4754.78 R23.2@1706,4758.56
NetQ5_2: Q5.2 R46.1 | length 90.9
  Bottom Layer w10: Q5.2@3814.12,1420.8 Q5.2@3816.29,1422.97
  Bottom Layer w20: R46.1@3814.12,1332.93 Q5.2@3814.12,1420.8
NetQ6_4: Q6.4 R50.2 | length 142.6
  Top Layer w10: Q6.4@3263,4551 3263,4549.81 3271.83,4540.98 3303.37,4540.98 3304.38,4541.99 3348.45,4541.99 v1(3349.46,4540.98)
  Bottom Layer w10: v1(3349.46,4540.98) 3391.46,4540.98 R50.2@3397.44,4535
NetQ7_3: Q7.3 R49.1 R50.1 | length 315.9
  Bottom Layer w10: R49.1@3355,4385.42 3355,4426.53 3452.56,4524.09 R50.1@3452.56,4535 ; R49.1@3356.35,4385.42 3356.35,4383.46 3367.09,4372.71 3369.06,4372.71 3376,4365.77 3376,4307 Q7.3@3403,4280
NetQ8_2: Q8.2 R54.1 | length 80.8
  Top Layer w20: Q8.2@6202.32,3508.56 6202.32,3497.73 6241.88,3458.18 6247.83,3458.18 R54.1@6253.57,3452.43
NRST: CN1.32 CON1.B12 | length 3008.5
  Top Layer w10: v1(2783.31,3345) 2785.4,3347.1 2785.4,3887.9 v1(2787.5,3890)
  Bottom Layer w10: CN1.32@2351.54,2161.23 2348.9,2163.86 2348.9,2250.37 2698.28,2599.75 2698.28,2931.33 2783.31,3016.36 v1(2783.31,3345) ; v1(2787.5,3890) 2809.35,3911.85 3452.85,3911.85 3576.69,4035.69 3635.69,4035.69 3667.91,4067.91 3667.91,4105.77 3713.17,4151.04 3713.17,4185.16 CON1.B12@3718.02,4190
OV: R43.1 R45.2 U5.3 | length 206
  Top Layer w10: R45.2@3731.25,1595.81 R45.2@3731.44,1596
  Top Layer w15: R43.1@3688.43,1595.81 R45.2@3731.25,1595.81 ; R45.2@3731.44,1596 3731.44,1634.65 3759.56,1662.77 U5.3@3844.03,1662.77
PRECHRG_CTRL: CN1.4 CON1.A9 | length 1169.8
  Bottom Layer w10: CN1.4@2568.07,4011.62 2568.07,3936.93 2646,3859 3587.02,3859 CON1.A9@3618.02,3890
PUMP_CTRL: CON1.B6 LD3.3 | length 1790
  Top Layer w10: v1(3994.51,2133.25) 3989,2127.74 3989,2122.73 4000.21,2111.53 4011.24,2111.53 4077.77,2044.99 LD3.3@4127.5,2044.99
  Bottom Layer w10: CON1.B6@3719,3590 3800,3509 3800,3088.69 3924,2964.69 3924,2598.16 3966.58,2555.58 3966.58,2326.98 3937.77,2298.17 3937.77,2173.97 3961.39,2150.34 3964.81,2150.34 3984.81,2130.34 3991.6,2130.34 v1(3994.51,2133.25)
PUMP_FB: CON2.A9 LD3.4 | length 4384.2
  Top Layer w10: CON2.A9@889,3890 937.92,3841.08 1016.69,3841.08 1069.5,3788.27 1069.5,3529.26 1336.76,3262 1988,3262 2129.75,3120.25 v1(2840,3120.25) ; v1(3486.27,2558.76) 3486.27,2521.73 3548,2460 3603.99,2460 3945.55,2118.43 4050.49,2013.5 LD3.4@4127.5,2013.5
  Bottom Layer w10: v1(2840,3120.25) 2842.15,3120.25 2876.5,3085.9 2876.5,2752.99 2989.27,2640.22 3404.82,2640.22 v1(3486.27,2558.76)
PUMP_FUSE: D18.2 F3.1 F3.2 LD3.8 LD3.9 LD3.10 LD3.11 R27.2 | length 4535.4
  Top Layer w130: F3.2@7222.88,2546.93 F3.1@7222.88,2413.07 7531.93,2413.07 7563,2382
  Top Layer w150: 4417.74,2027 4670.74,2027 4857.49,1840.25 4857.49,1627.61 5012.1,1473 v2(6221,1473)
  Bottom Layer w150: v2(6221,1473) 6546.22,1798.22 7299.22,1798.22 7581,2080 v2(7581,2359.86)
PUMP_PWR: CN2.34 D4.1 F3.3 F3.4 | length 2447.5
  Top Layer w20: D4.1@6662,2549.66 6756.34,2549.66 ; 6763.25,2546.93 F3.4@6833.12,2546.93
  Top Layer w90: v2(6708.1,2684.84) 6708.1,2671.95 F3.4@6833.12,2546.93 F3.3@6833.12,2413.07
  Top Layer w150: CN2.34@5608,1964.76 5751.77,1820.99 v2(6101.2,1820.99)
  Bottom Layer w90: v2(6101.2,1820.99) 6225.99,1820.99 6367,1962 6367,2667.28 6419.72,2720 6672.94,2720 v2(6708.1,2684.84)
PWR_MON_SCL: CON2.B3 R33.1 U3.7 | length 2921.6
  Top Layer w10: U3.7@1972,1506 1972.51,1506.51 2003.44,1506.51 2053.04,1556.11 2053.04,1558 ; v3(2038.68,1572.36) 2053.04,1558 ; R33.1@2136.54,1558 2053.04,1558
  Bottom Layer w11: CON2.B3@989,3290 940,3241 854.57,3241 732,3118.43 732,2826.03 1255,2303.03 1255,1846 1452.23,1648.77 1962.27,1648.77 v3(2038.68,1572.36)
PWR_MON_SDA: CON2.B2 R32.1 U3.6 | length 2606.4
  Top Layer w10: U3.6@1972,1486.31 1972.51,1486.83 2077.86,1486.83 v3(2079,1487.97) 2138.41,1487.97 R32.1@2141.44,1491
  Bottom Layer w10: 1988.64,1681.36 2079,1591 v3(2079,1487.97)
  Bottom Layer w11: CON2.B2@989,3190 997.5,3190 1330,2857.5 1330,1868 1516.64,1681.36 1988.64,1681.36
RED_LED_GND: CN2.22 L1.2 | length 979.4
  Top Layer w20: CN2.22@5609.06,2751.78 5609.06,2753.21 5692.23,2836.39 5989.89,2836.39 6182.13,3028.63 6206.41,3028.63 6216.37,3038.59 6216.37,3062.87 6255,3101.5 L1.2@6255,3275
SCHT_FROM_AUX_TO_ACC: CN1.28 CN2.36 | length 2913.3
  Bottom Layer w20: CN1.28@2568.07,2358.08 2741.25,2531.26 3384.48,2531.26 3542.74,2373 3690.99,2373 3787.55,2276.43 3787.72,2276.43 3818.43,2245.72 3818.43,2245.55 4011.03,2052.95 5071.7,2052.95 5159.89,1964.76 CN2.36@5174.93,1964.76
SCHT_OUT_LATCH: "Latching Delay1.3" L3.1 | length 2346.2
  Top Layer w20: v2(4684,3025) 4950,3025 5046.32,3121.32 5718.39,3121.32 5757.35,3160.28 v2(5953.08,3160.28)
  Bottom Layer w20: L3.1@4185,3005 4199.26,3019.26 4678.26,3019.26 v2(4684,3025) ; 5860,2685 5953.08,2778.08 v2(5953.08,3160.28)
SCHT_TAP: CN1.19 CN2.21 CN2.24 CON1.A6 | length 5096
  Top Layer w15: v1(2460,3411) v1(2460,3557) ; CON1.A6@3618.02,3590 3663.02,3635 v1(3820,3635)
  Bottom Layer w15: v1(2460,3411) 2460,3096.07 CN1.19@2568.07,2988 ; v1(2460,3557) 2460,3610.77 2529.23,3680 2627.22,3680 2737.13,3570.09 3586.61,3570.09 3606.52,3590 CON1.A6@3618.02,3590 ; v1(3820,3635) 3863,3592 3863,3130.23 4027,2966.23 4027,2698.84 4204.48,2521.36
  Bottom Layer w20: 4204.48,2521.36 4467.74,2258.1 4899.38,2258.1 5039.54,2398.26 5039.54,2695.54 5096.16,2752.16 CN2.24@5174.93,2752.16 CN2.21@5174.93,2988.38
SCHT_TAP_LATCHING: "Latching Delay1.4" CN2.19 | length 844.2
  Bottom Layer w20: CN2.19@5608,2988.38 5519.38,2899.76 5519.38,2702.72 5565.57,2656.53 5673.14,2656.53 5860,2469.66 5860,2385
SERIAL_Rx: CN1.34 CON2.A15 | length 3635.4
  Top Layer w10: CON2.A15@889,4490 929.44,4490 971.55,4532.12 1033.88,4532.12 1206,4360 1206,4014.01 v1(1325,3895.01) ; v1(1562,2846) 1564.65,2843.35 1564.65,2738.23 1618.88,2684 1907.94,2684 2047,2544.94 2047,2313.92 2089.92,2271 2145.04,2271 2338.03,2078.01 2387.44,2078.01 2501.08,1964.38 CN1.34@2568.07,1964.38
  Bottom Layer w10: v1(1325,3895.01) 1325,3353.58 1524.45,3154.14 1524.45,2883.55 v1(1562,2846)
SERIAL_Tx: CN1.39 CON2.A14 | length 3864.5
  Top Layer w10: CON2.A14@889,4390 929.44,4390 971.55,4432.12 1109.84,4432.12 1189,4352.96 1189,3992.12 v1(1286.55,3894.57) ; v1(1510.79,2846.2) 1546.7,2810.29 1546.7,2732.14 1611.84,2667 1900.9,2667 2030,2537.9 2030,2306.88 2082.88,2254 2138,2254 2331.83,2060.17 2381.24,2060.17 2426,2015.41 2426,1947 2246.53,1767.53 CN1.39@2135,1767.53
  Bottom Layer w10: v1(1286.55,3894.57) 1287,3894.12 1287,3367.54 1507.26,3147.28 1507.26,2849.72 v1(1510.79,2846.2)
SHCT_IN_LATCH: CN2.20 L4.5 | length 1696.4
  Bottom Layer w20: L4.5@4185,3940 4278,3940 4278,3776.59 4652.59,3402 4863,3402 5276.62,2988.38 CN2.20@5391.46,2988.38
SHDN: R47.2 U5.5 | length 309.4
  Top Layer w10: U5.5@3928.16,1634.3 3931.04,1637.18 U5.5@3947.18,1637.18
  Top Layer w20: R47.2@3715.56,1538 3876.1,1538 3947.18,1609.08 U5.5@3947.18,1637.18
Source: Q3.3 Q4.3 | length 416
  Top Layer w200: Q4.3@4138.54,1179.06 Q4.3@4140.64,1176.95
  Top Layer w300: Q3.3@3725.54,1179.06 Q4.3@4138.54,1179.06
STATUS_LIGHT_PWR: CN2.26 D11.1 F11.3 F11.4 | length 2788.8
  Top Layer w20: CN2.26@5392.52,2554.93 5487.25,2554.93 5538.18,2504 5574.02,2504 5583.02,2495 5632.98,2495 5641.98,2504 6564.38,2504 6601.02,2467.35 v1(6604,2467.35) ; v1(7097.53,2469.95) 7097.53,2351.77 7169.66,2279.64 7573.82,2279.64 D11.1@7630,2223.46 F11.4@7830.12,2223.46 F11.3@7830.12,2089.61
  Bottom Layer w20: v1(6604,2467.35) 6794.1,2467.35 6798.15,2471.41 7096.07,2471.41 v1(7097.53,2469.95)
SWCLK: CN1.33 CON1.A13 | length 3213.8
  Top Layer w10: v1(2700,3390) 2700,3477.79 2709.5,3487.29 2709.5,3731.05 2700,3740.55 v1(2700,3990)
  Bottom Layer w10: CN1.33@2135,2161.23 2211.46,2161.23 2273,2222.76 2273,2394 2460,2581 2460,2736 2478.76,2754.76 2478.76,2788.77 2531.08,2841.09 2579.45,2841.09 2616,2877.64 2616,2945.42 2700,3029.42 v1(2700,3390) ; v1(2700,3990) 2746,4036 3411.29,4036 3526,4150.71 3526,4197.98 CON1.A13@3618.02,4290
SWDIO: CN1.29 CON1.B14 | length 2978.4
  Top Layer w10: v1(2734,3432.5) 2736.74,3435.24 v1(2736.74,3898.7)
  Bottom Layer w10: CN1.29@2351.54,2358.08 2351.54,2383.99 2490,2522.46 2490,2555.08 2650,2715.08 2650,2931.33 2734,3015.33 v1(2734,3432.5) ; v1(2736.74,3898.7) 2793.04,3955 3411.38,3955 3593.39,4137.01 3624.59,4137.01 3671.93,4184.35 3671.93,4343.92 CON1.B14@3718.02,4390
SWO: CN1.18 CON1.A12 | length 2138.2
  Top Layer w20: v1(2056,3460) 2101.32,3505.32 2101.32,3514.4 2144.54,3557.61 2203.61,3557.61 2557.85,3911.85 v1(2659.11,3911.85)
  Bottom Layer w10: 3587.95,4176.26 3590.69,4176.26 ; CON1.A12@3604.42,4190 CON1.A12@3618.02,4190
  Bottom Layer w20: v1(2056,3460) 2056,3303.22 CN1.18@2135,3224.22 ; v1(2659.11,3911.85) 2683.87,3911.85 2765.71,3993.69 3405.37,3993.69 3587.95,4176.26 ; 3590.69,4176.26 CON1.A12@3604.42,4190
TRIG: C22.1 R53.2 U6.2 U6.6 | length 647.6
  Top Layer w10: U6.6@3053.78,4225 3102.56,4225 3192.56,4135 ; C22.1@3192,3895.44 C22.1@3204.44,3895.44 ; C22.1@3204.72,3906.19 3204.44,3905.91 C22.1@3204.44,3900.68 ; U6.2@3276.22,4175 3232.56,4175 3192.56,4135 ; R53.2@3286.89,3895.44 C22.1@3204.44,3895.44 ; 3192.56,4135 3192.56,4047.3 3222.28,4017.59 3232.56,4007.3 3232.56,3923.56 3209.68,3900.68 C22.1@3204.44,3900.68 ; C22.1@3204.44,3895.44 C22.1@3204.44,3900.68
TRIGER: C19.1 R40.2 U4.2 U4.6 | length 459.8
  Bottom Layer w10: R40.2@4117.78,1332.93 4126.56,1324.15 R40.2@4130.5,1324.15 4139.28,1315.37 R40.2@4146.1,1315.37 ; C19.1@4192.03,1269.44 C19.1@4194,1269.44
  Bottom Layer w15: R40.2@4146.1,1315.37 C19.1@4192.03,1269.44
  Bottom Layer w20: U4.2@4032.97,1444.56 4110.55,1444.56 ; R40.2@4117.78,1332.93 4117.78,1336.86 4110.55,1344.1 4110.55,1444.56 ; U4.6@4254.49,1495.49 4161.47,1495.49 4110.55,1444.56
TS_ACTIVE: CN1.25 L1.5 | length 4118.7
  Top Layer w10: CN1.25@2563.04,2559.96 2574.07,2559.96 2607.11,2593 2677.11,2593 2730,2645.89 2730,2762.04 2864.96,2897 v1(3164.74,2897) ; v1(3780.88,2808.57) 4118.78,2808.57 4129.31,2819.1 v1(4135,2819.1) ; v1(4705,2691.24) 5647.02,2691.24 5732.56,2776.78 5769.78,2776.78 v1(5788,2795)
  Bottom Layer w10: v1(3164.74,2897) 3677,2897 3761.59,2812.41 3777.03,2812.41 v1(3780.88,2808.57) ; v1(4135,2819.1) 4262.86,2691.24 v1(4705,2691.24) ; v1(5788,2795) 5788,2798.02 5801.34,2811.36 5801.34,3121.34 L1.5@5955,3275
UV_DELAY: Q5.1 R38.2 | length 79.4
  Bottom Layer w10: Q5.1@3829.4,1500.27 Q5.1@3832.56,1497.11
  Bottom Layer w15: Q5.1@3832.56,1497.11 R38.2@3907.44,1497.11
V_IN+: C17.2 R34.1 U3.2 | length 313.1
  Top Layer w10: C17.2@1579.18,1616 1642.92,1616 1712.95,1545.97 U3.2@1802.4,1545.97
  Top Layer w40: 1518.28,1616 C17.2@1576,1616 C17.2@1579.18,1616
V_IN-: C17.1 R36.1 U3.3 | length 316.5
  Top Layer w10: C17.1@1576,1561 1627.85,1561 1663.17,1525.68 U3.3@1802.71,1525.68
  Top Layer w40: R36.1@1508.7,1542 1527.7,1561 C17.1@1576,1561
VBATT_FUSE: CN1.36 D13.1 F13.3 F13.4 R34.2 R35.2 R48.1 U3.1 | length 2716.3
  Top Layer w10: 1255,1686.89 1644.7,1686.89 1766.54,1565.06 U3.1@1802.71,1565.06
  Top Layer w40: 1196.66,1616 R34.2@1431.7,1616
  Top Layer w150: F13.4@1002.14,1868 F13.3@1136,1868 1180.91,1912.91 v2(1500.7,1912.91)
  Top Layer w420: 1056.45,1747.92 1056.45,1365.19 1228.64,1193 1312.75,1193
  Bottom Layer w150: v2(1500.7,1912.91) 2083.53,1912.91 CN1.36@2135,1964.38
VBATT_RAW: C1.1 F13.1 F13.2 WM1.1 | length 624.8
  Top Layer w200: 1041,2406.37 C1.1@1041,2565.05
  Top Layer w420: 574.78,2164.2 821.83,2164.2 915.39,2257.76 F13.2@1002.14,2257.76
VCU_PWR: CN2.13 D6.1 F5.3 F5.4 | length 3501.9
  Top Layer w20: D6.1@7630,2737.93 D6.1@7631.5,2736.43 ; F5.4@7829.62,2736.43 F5.4@7831.12,2734.93 ; F5.4@7830.04,2755.96 F5.4@7831,2755
  Top Layer w50: F5.3@7831.12,2601.07 F5.4@7831.12,2734.93
  Top Layer w60: v1(7470.16,3773.46) 7470.16,2897.77 D6.1@7630,2737.93 ; D6.1@7631.5,2736.43 F5.4@7829.62,2736.43
  Bottom Layer w20: CN2.13@5608,3421.45 CN2.13@5608.38,3421.07
  Bottom Layer w60: CN2.13@5608.38,3421.07 5914.21,3421.07 6332.14,3839 7404.62,3839 v1(7470.16,3773.46)
VS: C18.2 C19.2 D21.1 K1.COM Q3.2 R39.2 R41.1 R42.1 R43.2 R47.1 U4.4 U4.8 U5.1 U5.7 | length 2434.1
  Top Layer w15: U5.1@3844.03,1713.95 3844.03,1768.96 ; U5.7@3947.18,1688.36 3947.55,1687.99 3993.51,1687.99 3996.5,1685 v1(4034.5,1685) ; R42.1@4211.24,1640.71 4217.03,1634.92 4234.38,1634.92 v2(4266.85,1602.46) 4268.88,1600.43 4268.88,1530.65 D21.1@4270.9,1528.62
  Top Layer w20: 3406.02,1699.18 3475.81,1768.96 3636.04,1768.96 ; R47.1@3665.15,1538 3636.04,1567.11 3636.04,1713.95 3636.04,1768.96 ; R42.1@4209.51,1643.66 4165.18,1687.99 v1(4140,1687.99) 4140,1740.36 4111.39,1768.96 3844.03,1768.96 3636.04,1768.96
  Top Layer w420: K1.COM@3338.63,1509.07 3406.85,1440.85
  Bottom Layer w15: C18.2@3955.14,1574.35 3993.39,1574.35 4007.99,1559.75 4007.99,1549.86 4013.28,1544.56 U4.4@4032.97,1544.56 4088.87,1544.56 4147.85,1603.54 v2@4265.76,1603.54 ; v1(4034.5,1685) 4035.99,1686.49 4138.51,1686.49 v1(4140,1687.99) ; C19.2@4194,1324.56 4194.2,1324.75 4262.05,1324.75 R39.2@4262.25,1324.95 4262.25,1389.27 4256.95,1394.56 U4.8@4255.41,1394.56 ; U4.8@4259.6,1391.92 4283.91,1391.92 4329.78,1437.79 4329.78,1539.53 v2(4266.85,1602.46) v2@4265.76,1603.54 ; v2@4269.91,1607.69 v2@4265.76,1603.54
VS_SWITCH: CN2.39 K1.A1 | length 2087.4
  Bottom Layer w40: K1.A1@3189.03,2013.01 3330.88,1871.15 5071.68,1871.15 CN2.39@5174.93,1767.91
VS_TO_SWITCH: CN2.37 K1.NO R35.1 R36.2 | length 4760.4
  Top Layer w40: R36.2@1439.54,1542 1439.54,1509.89 1618.43,1331 ; R35.1@1614.38,1175.52 R35.1@1623.91,1166
  Top Layer w420: 1771.89,1196.63 2301.63,1196.63 2519,1414
  Bottom Layer w40: K1.NO@2631.94,1414 2636.57,1409.37 2827.94,1218 3570.05,1218 3647,1294.95 3647,1713.1 3702.87,1768.96 4883.61,1768.96 4997.93,1654.65 5494.35,1654.65 5607.6,1767.91 CN2.37@5608,1767.91
pads on no net: CN1.31 CN2.5 CN2.8 CN2.14 CN2.28 CN2.29 K1.NC LD1.1 LD1.6 LD1.7 LD1.12 LD2.2 LD3.1 LD3.6 LD3.7 LD3.12 LD4.4 U3.8 U4.5 U4.7 U6.5 U6.7

## Polygon pours and split planes (outlines as drawn)
GND on Top Layer "GND_L01_P003" (solid, pour order 3): 269,4913 8467,4913 8467,968 269,968
PUMP_FUSE on Top Layer "PUMP_FUSE_L01_P005" (solid, pour order 5): 4313,2086 4371,2086 4371,1972.99 4370.99,1973 4313,1973
GND on Bottom Layer "GND_L02_P010" (solid, pour order 10): 8467,968.26 8467,4913 269,4913 269,968

## Other copper
Top Layer:
  region net GLV: 8419,1398.37 8419,4217 8019,4217 8019,1398.37
  region net FANS_FUSE: 4317,2301 4317.36,2300.64 4317.36,2197.56 4367.58,2197.56 4367.09,2198.06 4367.09,2301
  text "String" at 2278.98,3944.48 h60
  text "String" at 2268.98,3932.74 h60
  text "String" at 2280.99,3917.9 h60
  text "String" at 2242.5,3885.02 h60